# Altium PCB Board3ph.PcbDoc (part 2 of 2)
Units mm, origin at the board's own origin, x right, y up, seen from the top; angles counter-clockwise.
Board outline 64.06 x 79.42 mm, 4 copper layers (Top Layer, Mid Layer, Mid Layer 2, Bottom Layer), stack 0.743 mm thick; 89 components, 80 nets, 350 pads, 102 vias.
Unrouted connection lines stored in the file: 3.
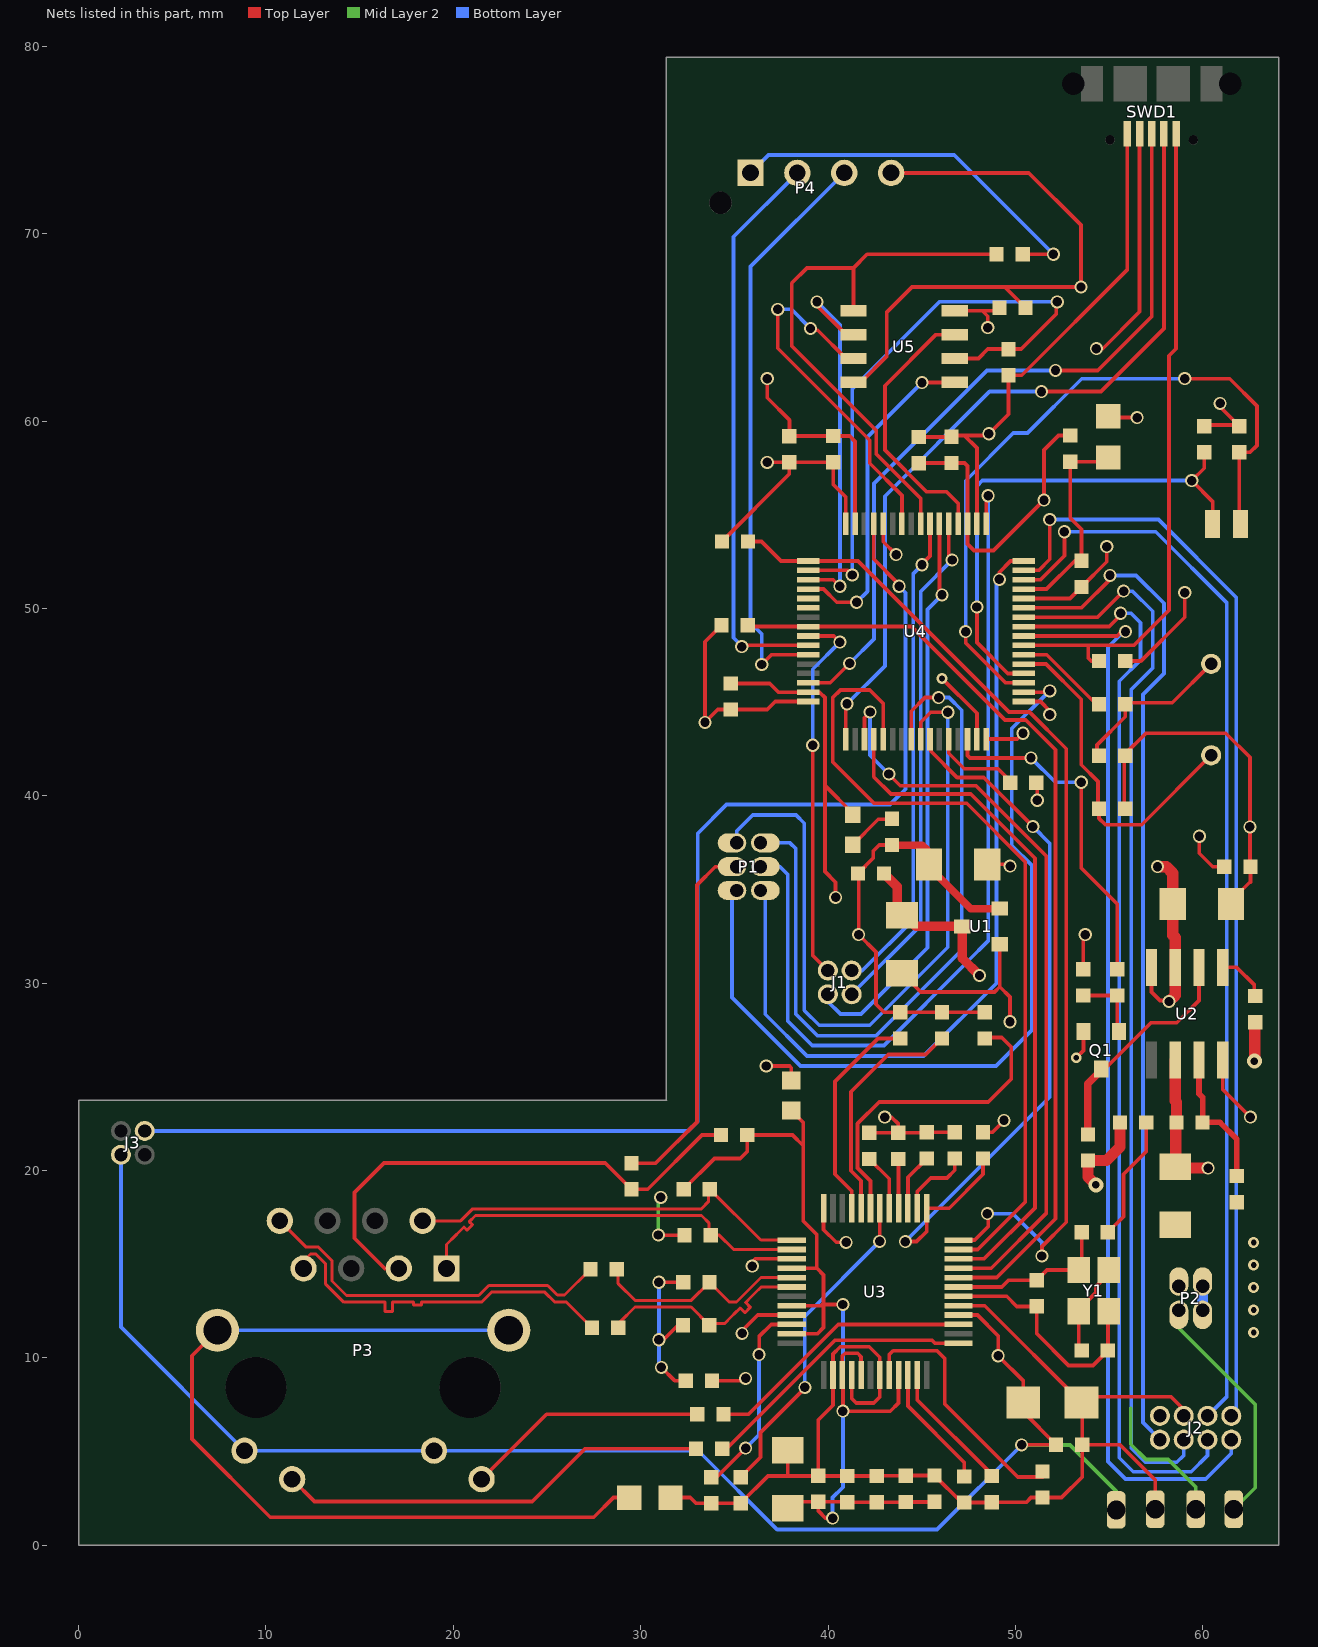
[diagram p4: the nets of this part, all layers, seen from the top]

## Part data (continued)
U5: "EEPROM Memory IC 2Mb _256K x 8_ SPI 5MHz 8-SO", Case Code (Metric)=SOIC-8, Manufacturer=STMicroelectronics, Manufacturer Part Number=M95M02-DWMN3TP/K, Supplier Part Number 1=497-15597-2-ND, ComponentLink1Description=Supplier, ComponentLink1URL=https://www.digikey.fr/product-detail/fr/stmicroelectronics/M95M04-DRMN6TP/497-M95M04-DRMN6TPDKR-ND/11482714, ComponentLink2Description=Datasheet, ComponentLink2URL=https://www.st.com/resource/en/datasheet/m95m04-dr.pdf, Memory Format=EEPROM, Memory Size=2Mb, Supplier 1=Digi-Key, Supplier Unit Price 1=$2.15
X1: library part XTAL, "8MHz ±30ppm Crystal 20pF 80 Ohms HC-49/US", Manufacturer="Fox Electronics", Manufacturer Part Number=FC4STCBMF8.0-BAG200, Supplier 1=Arrow, Supplier Part Number 1=FC4STCBMF8.0-BAG200, Supplier Unit Price 1=$0.2273
Y1: library part XTAL3225, "CRYSTAL 25.0000MHZ 8PF SMD", Case/Package=SMD/SMT, ESR (Equivalent Series Resistance)=100R, Frequency Stability=50ppm, Load Capacitance=8pF, Manufacturer="Kyocera AVX", Manufacturer Part Number=CX3225CA25000D0HSSCC, Supplier Part Number 1=1253-1142-1-ND, Tolerance=20ppm, ComponentLink1Description=Supplier, ComponentLink1URL=https://www.digikey.com/product-detail/en/kyocera-international-inc-electronic-components/CX3225CA25000D0HSSCC/1253-1142-1-ND/4453960, Frequency=25MHz, Supplier 1=Digi-Key
Y2: "ABS25 Series 32.768 kHz Â±20 ppm 6 pF -40 to +85 Â°C SMT Low Frequency Crystal", Case/Package=SMD/SMT, Frequency=32.768kHz, Frequency Tolerance=20ppm, Load Capacitance=9pF, Manufacturer="Micro Crystal", Manufacturer Part Number="CM8V-T1A 32.768kHz 9pF +/-20ppm TA QC", Max Operating Temperature=85°C, Min Operating Temperature=-40°C, Supplier Part Number 1=2195-CM8V-T1A-32.768KHZ-9PF-20PPM-TA-QCCT-ND, Length=2mm, Supplier 1=Digi-Key, Supplier Unit Price 1=$0.66

## Free pads (board coordinates)
  rrect50% 1x2 hole 1: 1(61.65,1.929) 2(59.618,1.929) 3(55.37,1.89) 3(57.459,1.929)

## Via types
v1: diameter 0.7, hole 0.5, Top Layer to Bottom Layer, 92 vias
v2: diameter 0.6, hole 0.3, Top Layer to Bottom Layer, 6 vias
v3: diameter 0.8, hole 0.4, Top Layer to Bottom Layer, 2 vias
v4: diameter 0.7, hole 0.5, Top Layer to Bottom Layer, tented both sides, 1 vias
v5: diameter 0.55, hole 0.3, Top Layer to Bottom Layer, 1 vias

## Nets (pads, with @x,y where several pads share a name; then routed paths per layer and width w, separated by ;. In a path a pad name is that pad's centre, name@x,y a point inside that pad or via, vN(x,y) a via of type N, cw(c..) or ccw(c..) an arc to the next point about the centre after c; other vN are vias at no path point)
+3V3: C2.2 C4.1 C6.2 C7.2 C8.2 C10.1 C11.2 C14.1 C25.1 C26.2 J3.1 L1.1 L2.1 P3.L1 P3.L3 P4.1 pad.3@55.37,1.89 R1.2 R3.1 R8.2 R14.2 R15.2 R16.2 R17.2 R21.2 R32.1 SWD1.4 U1.2 U3.28 U4.1 U4.19 U4.32 U4.48 U4.64 U5.8 | length 193.2
  Top Layer w0.2: R21.2@34.393,49.183 R21.2@34.31,49.1 33.43,48.22 v1(33.43,43.921) 34.109,44.6 C8.2@34.81,44.6 ; R17.2@34.54,53.57 R17.2@34.333,53.57 37.93,57.167 C7.2@37.93,57.793 ; C8.2@35.063,44.6 36.75,44.6 37.18,45.03 U4.48@38.94,45.03 ; v1(36.7,25.58) 37.94,25.58 38.03,25.49 L1.1@38.03,24.81 ; v1(36.75,57.793) C7.2@37.93,57.793 ; U4.32@40.94,54.53 40.94,55.95 40.28,56.61 C6.2@40.28,57.803 37.94,57.803 C7.2@37.93,57.793 ; R3.1@43.41,37.373 42.733,37.373 42.41,37.05 42.41,36.675 R1.2@41.591,35.856 41.63,35.817 v1(41.63,32.59) 42.56,31.66 42.56,28.875 42.988,28.447 R14.2@43.85,28.447 R15.2@46.08,28.447 R16.2@48.36,28.447 ; C11.2@44.84,57.753 46.58,57.753 C10.1@46.59,57.763 47.284,57.763 47.44,57.607 U4.19@47.44,54.53 47.44,53.433 47.783,53.09 48.83,53.09 v1(51.52,55.78) 51.52,58.46 52.29,59.23 L2.1@52.917,59.23 ; U5.8@46.753,65.88 48.229,65.88 ; U3.28@46.96,12.29 47.97,12.29 49.08,11.18 49.08,10.13 v1(49.07,10.12) 50.42,8.77 C25.1@50.42,7.63 50.42,7.11 C26.2@52.16,5.37 50.34,5.37 v1(50.33,5.36) ; R8.2@48.27,22.047 48.767,22.047 49.4,22.68 v1(49.39,22.68) ; U4.64@48.44,43.03 50.09,43.03 v1(50.4,43.34) ; v1(48.516,64.983) 48.516,65.593 48.229,65.88 ; C14.1@49.142,66.039 48.982,65.88 48.229,65.88 ; R32.1@50.387,68.9 v1(52.021,68.9) ; U4.1@50.44,45.03 51.331,45.03 51.83,44.531 v1(51.83,44.33) ; v1(54.313,63.862) 54.654,63.862 56.62,65.828 SWD1.4@56.62,75.325 ; v1(59.81,37.84) 59.81,36.934 60.526,36.218 C2.2@61.14,36.218
  Top Layer w0.4: R3.1@43.41,37.373 45.036,37.373 45.27,37.139 45.27,36.461 C4.1@45.39,36.341 45.39,36.191 47.6,33.98 U1.2@49.16,33.98 U1.2@49.135,34.005
  Mid Layer 2 w0.2: v1(50.33,5.36) 52.91,5.36 55.37,2.9 pad.3@55.37,1.89
  Bottom Layer w0.2: J3.1@2.262,20.844 2.262,11.648 P3.L1@8.86,5.05 P3.L3@18.97,5.05 33.07,5.05 37.28,0.84 45.81,0.84 v1(50.33,5.36) ; P4.1@35.86,73.24 36.814,74.194 46.727,74.194 v1(52.021,68.9)
+3V3A: C19.2 C20.2 C21.2 C22.2 C23.2 C37.1 L1.2 R18.2 R19.2 R20.2 U3.4 U3.8 U3.11 U3.15 U3.17 U3.21 | length 61
  Top Layer w0.2: v1(30.94,16.56) 30.95,16.55 R19.2@32.34,16.55 ; v1(31.067,18.57) v1@31.067,18.784 ; R18.2@32.293,19.01 33.933,20.65 35.31,20.65 35.68,21.02 R20.2@35.68,21.9 38.1,21.9 38.67,21.33 ; C37.1@37.85,1.98 38.193,2.323 C23.2@39.48,2.323 ; L1.2@38.03,23.21 38.67,22.57 38.67,21.33 ; U3.11@38.06,11.29 39.43,11.29 39.76,11.62 39.76,12.85 ; U3.8@38.06,12.79 39.64,12.79 39.7,12.85 ; U3.4@38.06,14.79 39.4,14.79 ; v1(40.24,1.45) 39.86,1.45 39.48,1.83 C23.2@39.48,2.323 ; v1(40.79,12.85) 39.76,12.85 ; U3.17@41.76,9.09 41.76,10.07 41.58,10.25 40.91,10.25 40.76,10.1 U3.15@40.76,9.09 40.79,9.06 v1(40.79,7.16) 43.32,7.16 43.76,7.6 U3.21@43.76,9.09 ; C19.2@45.68,2.333 45.66,2.313 C20.2@44.15,2.313 44.143,2.306 C21.2@42.59,2.306 C22.2@41.02,2.306 41.003,2.323 C23.2@39.48,2.323 ; 38.67,21.33 38.67,17.31 39.4,16.58 39.4,14.79 ; 39.4,14.79 39.76,14.43 39.76,12.91 39.7,12.85 ; 39.7,12.85 39.76,12.85
  Mid Layer 2 w0.2: v1(30.94,16.56) 30.94,18.443 v1(31.067,18.57)
  Bottom Layer w0.2: v1(40.24,1.45) 40.24,2.55 40.79,3.1 v1(40.79,7.16) v1(40.79,12.85)
ACTLED: R28.2 U3.27 | length 14.5
  Top Layer w0.2: R28.2@34.42,7 35.75,7 40.54,11.79 U3.27@46.96,11.79
BOOT0: R7.2 U4.60 | length 4.7
  Top Layer w0.2: U4.60@46.44,43.03 46.44,42.27 47.27,41.44 49.06,41.44 R7.2@49.77,40.73
CLK_L: J2.4 U4.9 | length 58
  Top Layer w0.2: U4.9@50.44,49.03 55,49.03 55.612,49.642 v1(55.612,49.74)
  Bottom Layer w0.2: v1(55.612,49.74) 56.16,49.74 56.67,49.23 56.67,47.24 55.54,46.11 55.54,4.67 56.28,3.93 59.38,3.93 60.248,4.798 J2.4@60.248,5.641
CS: J1.2 U4.41 | length 20.3
  Top Layer w0.2: U4.41@38.94,48.53 40.3,48.53 v1(40.63,48.2) ; v1(39.18,42.7) 39.18,31.483 J1.2@39.986,30.677
  Bottom Layer w0.2: v1(39.18,42.7) 39.18,46.75 v1(40.63,48.2)
CS_EE: R32.2 U4.24 U5.1 | length 29.5
  Top Layer w0.2: U5.1@41.353,65.88 41.353,68.17 ; U4.24@44.94,54.53 44.94,55.869 42.57,58.239 42.57,59.499 38.06,64.009 38.06,67.359 38.871,68.17 41.353,68.17 ; R32.2@48.99,68.9 42.083,68.9 41.353,68.17
CS_ETH: R21.1 U3.32 U4.40 | length 50.7
  Top Layer w0.2: R21.1@35.707,49.1 35.777,49.03 U4.40@38.94,49.03 44.453,49.03 49.443,44.04 50.549,44.04 52.135,42.453 52.135,17.425 49,14.29 U3.32@46.96,14.29
GND: C2.1 C3.2 C4.2 C5.2 C6.1 C7.1 C8.1 C9.1 C10.2 C11.1 C12.1 C13.1 C14.2 C16.1 C17.1 C18.1 C19.1 C20.1 C21.1 C22.1 C23.1 C24.1 C25.2 C26.1 C28.1 C29.1 C31.1 C32.1 C33.1 C34.1 C35.2 C36.2 C37.2 C38.2 J2.5 LED1.2 P1.4 P2.3 P2.4 P4.4 pad.3@57.459,1.929 Q1.2 R6.1 R7.1 R9.2 R10.2 R11.2 R12.2 R13.2 R23.1 R27.1 R33.2 R35.1 SWD1.5 U1.1 U2.8 U3.3 U3.9 U3.14 U3.16 U3.19 U3.29 U3.48 U4.12 U4.18 U4.28 U4.31 U4.47 U4.63 U5.4 Y1.2 Y1.4 | length 265.4
  Top Layer w0.2: C24.1@29.51,20.397 30.807,20.397 33,22.59 33,35.24 33.978,36.218 P1.4@35.125,36.218 ; C32.1@31.59,2.55 32.646,2.55 32.953,2.243 R23.1@33.76,2.243 R13.2@35.331,2.243 36.791,3.703 37.85,3.703 ; C31.1@33.807,8.79 35.48,8.79 v1(35.6,8.91) ; C8.1@34.81,45.997 36.883,45.997 37.35,45.53 U4.47@38.94,45.53 39.543,45.53 39.83,45.243 39.83,40.55 ; v1(35.41,11.31) 35.41,11.45 36.25,12.29 U3.9@38.06,12.29 ; v1(35.95,14.9) 35.95,15.12 36.12,15.29 U3.3@38.06,15.29 ; v1(36.75,62.26) 36.75,61.237 37.94,60.047 C7.1@37.94,59.2 ; C37.2@37.85,5.08 37.85,3.703 ; C7.1@37.93,59.19 C7.1@37.94,59.2 ; C23.1@39.48,3.72 39.48,6.699 40.26,7.479 U3.14@40.26,9.09 40.26,10.21 40.65,10.6 42.2,10.6 42.76,10.04 U3.19@42.76,9.09 42.76,7.92 42.44,7.6 41.5,7.6 41.26,7.84 U3.16@41.26,9.09 ; U3.48@39.76,17.99 39.76,16.84 40.43,16.17 v1(40.96,16.17) ; v1(40.4,34.58) 40.4,35.386 39.83,35.956 39.83,40.55 ; LED1.2@41.31,38.98 41.31,39.07 39.83,40.55 ; U5.4@41.353,62.07 41.753,62.07 43.123,63.44 43.123,65.793 44.48,67.15 49.428,67.15 ; U4.31@41.44,54.53 41.44,58.91 41.15,59.2 C6.1@40.28,59.2 C7.1@37.94,59.2 ; R12.2@42.2,22.02 43.747,22.02 R11.2@43.75,22.017 ; U4.28@42.94,54.53 42.94,53.56 v1(43.63,52.87) ; v1(43.02,22.85) 43.39,22.85 43.75,22.49 R11.2@43.75,22.017 ; P4.4@43.36,73.24 50.71,73.24 53.495,70.455 v1(53.495,67.15) 49.428,67.15 ; C3.2@43.94,30.53 44.939,29.531 48.877,29.531 49.16,29.814 ; C11.1@44.84,59.15 46.58,59.15 C10.2@46.59,59.16 46.66,59.23 47.27,59.23 ; v2(46.08,46.26) 47.94,44.4 U4.63@47.94,43.03 ; R9.2@46.76,22.047 R10.2@45.27,22.047 45.24,22.017 R11.2@43.75,22.017 ; U3.29@46.96,12.79 48.36,12.79 C25.2@53.52,7.63 ; U4.18@47.94,54.53 47.94,58.56 47.27,59.23 ; C4.2@48.49,36.341 49.617,36.341 v1(49.713,36.245) ; U1.1@49.16,32.08 49.16,29.814 ; v1(49.71,27.94) 49.71,29.264 49.16,29.814 ; U4.12@50.44,50.53 52.91,50.53 C9.1@53.52,51.14 54.87,52.49 v1(54.87,53.3) ; C14.2@50.539,66.039 49.428,67.15 ; v1(51.16,39.76) 51.16,39.82 51.167,39.827 R7.1@51.167,40.73 ; v5(53.24,26.02) 53.627,26.407 Q1.2@53.627,27.423 ; C29.1@53.533,10.4 53.37,10.563 Y1.2@53.37,12.49 53.37,12.56 54.3,13.49 54.3,13.82 54.97,14.49 Y1.4@54.97,14.69 Y1.4@54.927,14.733 ; R35.1@53.617,30.74 53.617,32.487 v1(53.72,32.59) ; C5.2@54.533,60.46 54.638,60.565 C5.2@54.953,60.25 55.02,60.183 v1(56.493,60.183) ; C28.1@54.927,16.71 55.758,17.541 55.758,19.8 56.977,21.019 C38.2@56.977,22.57 ; C16.1@55.797,39.31 55.797,42.18 56.957,43.34 61.224,43.34 62.51,42.054 v1(62.51,38.34) 62.51,36.245 C2.1@62.537,36.218 62.537,35.386 62.506,35.386 61.494,34.374 C12.1@61.494,34.224 ; C17.1@55.857,47.19 56.69,47.19 59.03,49.53 v1(59.03,50.84) ; SWD1.5@55.97,75.325 55.97,68.08 50.33,62.44 R33.2@49.623,62.44 49.623,60.363 48.49,59.23 47.27,59.23 ; pad.3@57.459,1.929 57.459,3.491 55.58,5.37 C26.1@53.557,5.37 ; J2.5@58.978,6.911 58.978,7.252 58.3,7.93 53.52,7.93 C25.2@53.52,7.63 ; C35.2@60.069,59.727 60.127,59.785 C36.2@61.865,59.785 ; v1(60.919,60.944) 61.014,60.849 61.014,60.658 C36.2@61.945,59.727 ; U2.8@61.065,25.895 61.065,24.322 v1(62.537,22.85) ; 37.85,3.703 C22.1@41.02,3.703 C21.1@42.59,3.703 42.597,3.71 C20.1@44.15,3.71 44.17,3.73 C19.1@45.68,3.73 47.127,2.283 C34.1@47.27,2.283 48.72,2.283 R27.1@48.74,2.303 50.587,2.303 50.834,2.55 C33.1@51.44,2.55 52.457,2.55 53.557,3.65 C26.1@53.557,5.37 ; C25.2@53.52,7.63 53.557,7.593 C26.1@53.557,5.37
  Bottom Layer w0.6: P2.3@59.98,12.57 P2.4@59.98,13.84
  other v1: 48.58,59.32
  other v2: 62.706,11.362 62.706,12.562 62.706,13.762 62.706,14.962 62.706,16.162
GNDA: C32.2 P3.1 P3.2 | length 47.4
  Top Layer w0.2: P3.2@7.41,11.48 6.05,10.12 6.05,5.68 10.23,1.5 27.49,1.5 28.54,2.55 C32.2@29.39,2.55
  Bottom Layer w0.2: P3.2@7.41,11.48 P3.1@22.96,11.48
HOLD_EE: U4.20 U5.7 | length 14.4
  Top Layer w0.2: U5.7@46.753,64.61 45.753,64.61 43.03,61.887 43.03,58.448 45.251,56.226 46.314,56.226 46.94,55.6 U4.20@46.94,54.53
IRQ: J2.8 U4.11 | length 54.4
  Top Layer w0.2: U4.11@50.44,50.03 53.526,50.03 55.045,51.549 v1(55.045,51.76)
  Bottom Layer w0.2: v1(55.045,51.76) 56.43,51.76 57.92,50.27 57.92,46.52 56.8,45.4 56.8,6.549 J2.8@57.708,5.641
LD_PWR_G: U4.38
LD_PWR_R: U4.37
LED1: P1.5 U4.56 | length 39.6
  Top Layer w0.2: U4.56@44.44,43.03 44.44,44.51 45.169,45.239 v1(45.9,45.239)
  Bottom Layer w0.2: P1.5@36.395,37.488 37.972,37.488 38.27,37.19 38.27,28.35 39.43,27.19 42.55,27.19 43.877,28.517 47.13,31.77 47.13,44.569 46.459,45.239 v1(45.9,45.239)
LED2: P1.6 U4.57 | length 39.6
  Top Layer w0.2: U4.57@44.94,43.03 44.94,43.921 45.478,44.46 v1(46.39,44.46)
  Bottom Layer w0.2: P1.6@35.125,37.488 35.125,38.125 35.98,38.98 38.29,38.98 38.73,38.54 38.73,28.55 39.53,27.75 42.22,27.75 46.39,31.92 v1(46.39,44.46)
LINKLED: R26.2 U3.25 | length 15.1
  Top Layer w0.2: R26.2@34.35,5.16 34.576,5.16 40.366,10.95 45.55,10.95 45.71,10.79 U3.25@46.96,10.79
MISO: J1.1 U4.22 | length 30.5
  Top Layer w0.2: U4.22@45.94,54.53 45.94,50.86 v1(46.08,50.72)
  Bottom Layer w0.2: J1.1@39.986,29.407 39.986,29.02 40.656,28.35 41.76,28.35 45.3,31.89 45.3,49.94 v1(46.08,50.72)
MISO_EE: U4.35 U5.2 | length 20.3
  Top Layer w0.2: U4.35@38.94,51.53 40.28,51.53 v1(40.63,51.18) ; v1(39.41,66.36) 39.41,66.153 40.953,64.61 U5.2@41.353,64.61
  Bottom Layer w0.2: v1(39.41,66.36) 40.63,65.14 v1(40.63,51.18)
MISO_ETH: U3.34 U4.52 | length 36.3
  Top Layer w0.2: U4.52@42.44,43.03 42.44,41.01 43.36,40.09 47.61,40.09 51.035,36.665 51.035,18.005 48.32,15.29 U3.34@46.96,15.29
MOSI: J1.4 U4.23 | length 25.9
  Top Layer w0.2: v1(45.01,52.33) 45.01,52.37 45.44,52.8 U4.23@45.44,54.53
  Bottom Layer w0.2: J1.4@41.256,30.677 41.827,30.677 44.55,33.4 44.55,51.87 v1(45.01,52.33)
MOSI_EE: U4.36 U5.5 | length 17.8
  Top Layer w0.2: U4.36@38.94,51.03 39.761,51.03 40.462,50.33 v1(41.52,50.33) ; v1(45.01,62.05) 46.733,62.05 U5.5@46.753,62.07
  Bottom Layer w0.2: v1(41.52,50.33) 42.1,50.91 42.1,59.14 v1(45.01,62.05)
MOSI_ETH: U3.35 U4.53 | length 43.7
  Top Layer w0.2: U4.53@42.94,43.03 42.94,44.93 42.22,45.65 40.66,45.65 40.25,45.24 40.25,41.8 42.45,39.6 47.4,39.6 50.515,36.485 50.515,18.315 47.99,15.79 U3.35@46.96,15.79
NetC5_1: C5.1 C9.2 L2.2 U4.13 | length 11.4
  Top Layer w0.2: U4.13@50.44,51.03 51.651,51.03 53.158,52.537 C9.2@53.52,52.537 53.52,54.229 52.917,54.832 L2.2@52.917,57.833 54.736,57.833 C5.1@54.953,58.05 C5.1@54.98,58.023
NetC18_2: C18.2 R29.2 X1.1 | length 8.9
  Top Layer w0.2: C18.2@54.35,42.13 54.35,42.71 55.857,44.217 R29.2@55.857,44.89 ; R29.2@55.783,44.963 58.364,44.963 X1.1@60.44,47.04
NetC24_2: C24.2 P3.R3 R20.1 | length 27.5
  Top Layer w0.2: P3.R3@17.09,14.78 16.34,14.78 14.73,16.39 14.73,18.83 16.3,20.4 28.11,20.4 C24.2@29.51,19 30.372,19 33.272,21.9 R20.1@34.283,21.9
NetC31_2: C31.2 R24.1 R25.1 | length 9.1
  Top Layer w0.2: v1(30.97,10.97) 31.21,10.97 31.99,11.75 R24.1@32.26,11.75 ; v1(30.97,14.04) R25.1@32.27,14.04 R25.1@32.26,14.03 ; v1@31.11,9.51 v1(31.1,9.5) 31.81,8.79 C31.2@32.41,8.79
  Mid Layer 2 w0.2: v1@31.09,9.51 v1(31.1,9.5)
  Bottom Layer w0.2: v1(30.97,14.04) v1(30.97,10.97) 30.97,9.63 v1@31.09,9.51
NetC33_2: C33.2 U3.20 | length 13.6
  Top Layer w0.2: U3.20@43.26,9.09 43.26,10.18 43.47,10.39 45.81,10.39 46.23,9.97 46.23,7.54 50.12,3.65 C33.2@51.44,3.65
NetC34_2: C34.2 U3.22 | length 6.7
  Top Layer w0.2: U3.22@44.26,9.09 44.26,7.43 47.27,4.42 C34.2@47.27,3.68
NetC35_1: C35.1 U4.4 Y2.1 | length 27.7
  Top Layer w0.2: v1(47.94,50.077) 47.94,48.18 49.59,46.53 U4.4@50.44,46.53 ; C35.1@60.069,58.33 60.069,57.482 v1(59.407,56.82) 60.52,55.707 Y2.1@60.52,54.51
  Bottom Layer w0.2: v1(47.94,50.077) 47.94,56.531 48.229,56.82 v1(59.407,56.82)
NetC36_1: C36.1 U4.3 Y2.2 | length 38.1
  Top Layer w0.2: v1(47.34,48.76) 47.34,48.16 49.47,46.03 U4.3@50.44,46.03 ; v1(59.03,62.26) 61.43,62.26 62.89,60.8 62.89,58.7 62.52,58.33 C36.1@61.945,58.33 61.945,54.585 Y2.2@62.02,54.51
  Bottom Layer w0.2: v1(47.34,48.76) 47.34,56.81 49.885,59.355 50.635,59.355 53.54,62.26 v1(59.03,62.26)
NetLED1_1: LED1.1 R3.2 | length 2.7
  Top Layer w0.2: LED1.1@41.31,37.38 42.68,38.75 43.39,38.75 R3.2@43.41,38.77
NetP3_L2: P3.L2 R26.1 | length 23.2
  Top Layer w0.2: P3.L2@11.4,3.53 12.59,2.34 24.21,2.34 27.03,5.16 R26.1@32.953,5.16
NetP3_L4: P3.L4 R28.1 | length 13
  Top Layer w0.2: P3.L4@21.51,3.53 24.98,7 R28.1@33.023,7
NetQ1_1: Q1.1 R34.2 R35.2 | length 3.8
  Top Layer w0.2: R35.2@53.617,29.343 R34.2@55.429,29.343 55.429,27.522 Q1.1@55.527,27.423
NetQ1_3: Q1.3 R2.1 U2.2 | length 12.3
  Top Layer w0.2: Q1.3@54.577,25.423 54.577,25.492 54.828,25.492 57.23,27.894 58.61,27.894 59.795,29.078 U2.2@59.795,30.845
  Top Layer w0.4: R2.1@53.867,21.93 53.867,24.644 54.577,25.354 Q1.3@54.577,25.423
NetR4_2: R4.2 U2.1 | length 2.8
  Top Layer w0.2: U2.1@60.965,30.845 U2.1@61.065,30.845 61.812,30.845 62.747,29.91 62.747,29.37 R4.2@62.8,29.317
NetR5_1: R5.1 R6.2 U2.7 | length 7.6
  Top Layer w0.3: U2.7@59.795,25.895 59.795,24.1 59.985,23.91 R5.1@59.985,22.57 60.915,22.57 61.812,21.673 R6.2@61.812,19.712
NetR9_1: R9.1 U3.38 | length 4
  Top Layer w0.2: U3.38@44.76,17.99 44.76,18.89 45.48,19.61 46.35,19.61 46.76,20.02 R9.1@46.76,20.65
NetR10_1: R10.1 U3.39 | length 3.1
  Top Layer w0.2: U3.39@44.26,17.99 44.26,19.64 R10.1@45.27,20.65
NetR11_1: R11.1 U3.40 | length 2.6
  Top Layer w0.2: R11.1@43.75,20.62 43.76,20.61 U3.40@43.76,17.99
NetR12_1: R12.1 U3.41 | length 3.1
  Top Layer w0.2: R12.1@42.2,20.623 43.26,19.563 U3.41@43.26,17.99
NetR13_1: R13.1 U3.42 | length 17.4
  Top Layer w0.2: R13.1@35.331,3.64 36.398,4.707 36.398,6.029 38.76,8.391 v1(38.76,8.43) ; v1(42.75,16.22) 42.75,17.98 U3.42@42.76,17.99
  Bottom Layer w0.2: v1(38.76,8.43) 38.76,12.23 v1(42.75,16.22)
NetR23_2: R23.2 U3.10 | length 10.7
  Top Layer w0.2: R23.2@33.76,3.64 34.05,3.64 v1(35.6,5.19) ; v1(36.31,10.18) 36.32,10.19 36.32,11.14 36.97,11.79 U3.10@38.06,11.79
  Bottom Layer w0.2: v1(35.6,5.19) 36.31,5.9 v1(36.31,10.18)
NetR27_2: R27.2 U3.23 | length 7
  Top Layer w0.2: U3.23@44.76,9.09 44.76,7.76 48.74,3.78 R27.2@48.74,3.7
NetR34_1: R34.1 U4.62 | length 18.3
  Top Layer w0.2: U4.62@47.44,43.03 47.44,42.154 47.573,42.021 v1(50.83,42.021) ; v1(53.51,40.72) 53.51,36.142 55.429,34.224 R34.1@55.429,30.74
  Bottom Layer w0.2: v1(50.83,42.021) 52.131,40.72 v1(53.51,40.72)
NetSWD1_2: SWD1.2 U4.49 | length 42.6
  Top Layer w0.2: U4.49@40.94,43.03 v1@40.94,44.72 ; v1(51.39,61.57) 54.56,61.57 57.92,64.93 SWD1.2@57.92,75.325
  Bottom Layer w0.2: v1(41.01,44.91) 43.03,46.93 43.03,55.98 48.62,61.57 v1(51.39,61.57)
NetSWD1_3: SWD1.3 U4.46 | length 41
  Top Layer w0.2: U4.46@38.94,46.03 40.11,46.03 v1(41.15,47.07) ; v1(52.131,62.7) 54.39,62.7 57.27,65.58 SWD1.3@57.27,75.325
  Bottom Layer w0.2: v1(41.15,47.07) 42.45,48.37 42.45,56.67 48.48,62.7 v1(52.131,62.7)
OE: J2.6 U4.10 | length 57.3
  Top Layer w0.2: U4.10@50.44,49.53 54.38,49.53 v1(55.77,50.92) v1@55.77,50.77
  Bottom Layer w0.2: v1(55.77,50.92) 56.25,50.92 57.32,49.85 57.32,46.82 56.18,45.68 56.18,5.19 56.94,4.43 58.61,4.43 58.978,4.798 J2.6@58.978,5.641
PH0-OSC_IN: C16.2 U4.5 X1.2 | length 18.3
  Top Layer w0.2: U4.5@50.44,47.03 51.63,47.03 53.51,45.15 53.51,41.66 54.4,40.77 54.4,39.31 C16.2@54.46,39.31 54.46,38.796 54.802,38.454 56.734,38.454 X1.2@60.44,42.16
PH1-OSC_OUT: R29.1 U4.6 | length 5
  Top Layer w0.2: U4.6@50.44,47.53 51.673,47.53 R29.1@54.313,44.89
PIO0_7/INT_N: R17.1 U3.36 U4.33 | length 56
  Top Layer w0.2: R17.1@35.73,53.57 36.45,53.57 37.49,52.53 U4.33@38.94,52.53 41.591,52.53 49.651,44.47 50.75,44.47 52.705,42.515 52.705,17.245 51.41,15.95 v1(51.41,15.44) ; U3.36@46.96,16.29 47.83,16.29 48.55,17.01 48.55,17.65 v1(48.5,17.7)
  Bottom Layer w0.2: v1(48.5,17.7) 49.87,17.7 51.41,16.16 v1(51.41,15.44)
PM0: J2.3 U4.14 | length 58
  Top Layer w0.2: U4.14@50.44,51.53 51.331,51.53 52.61,52.809 v1(52.61,54.09)
  Bottom Layer w0.2: v1(52.61,54.09) 57.48,54.09 61.28,50.29 61.28,7.943 J2.3@60.248,6.911
PM1: J2.1 U4.15 | length 59.2
  Top Layer w0.2: U4.15@50.44,52.03 51.24,52.03 51.83,52.62 v1(51.83,54.74)
  Bottom Layer w0.2: v1(51.83,54.74) 57.625,54.74 61.78,50.585 61.78,49.815 61.78,7.173 J2.1@61.518,6.911
PMODE0: R14.1 U3.45 | length 11.6
  Top Layer w0.2: U3.45@41.26,17.99 41.26,18.91 40.37,19.8 40.37,24.75 42.67,27.05 R14.1@43.85,27.05
PMODE1: R15.1 U3.44 | length 12.5
  Top Layer w0.2: U3.44@41.76,17.99 41.76,19.453 41.219,19.993 41.219,24.209 43.21,26.2 45.215,26.2 46.08,27.065 R15.1@46.08,27.1
POMDE2: R16.1 U3.43 | length 17.4
  Top Layer w0.2: U3.43@42.26,17.99 42.26,19.447 41.569,20.138 41.569,22.505 42.724,23.66 48.55,23.66 49.77,24.88 49.77,26.6 49.27,27.1 48.41,27.1 R16.1@48.367,27.057 ; R16.1@48.36,27.05 R16.1@48.367,27.057 ; R16.1@48.36,27.1 48.36,27.065 R16.1@48.367,27.057
RESET: J3.4 U4.29 | length 72
  Top Layer w0.2: U4.29@42.44,54.53 42.44,52.63 43.79,51.28 v1(43.79,51.18)
  Bottom Layer w0.2: J3.4@3.532,22.114 3.536,22.11 32.53,22.11 33.04,22.62 33.04,37.995 34.575,39.53 43.31,39.53 44.13,40.35 44.13,50.84 v1(43.79,51.18)
RI: P1.2 U4.2 | length 45
  Top Layer w0.2: U4.2@50.44,45.53 51.76,45.53 v1(51.83,45.6)
  Bottom Layer w0.2: P1.2@35.125,34.948 34.871,34.694 34.871,29.239 38.53,25.58 48.96,25.58 50.88,27.5 50.88,36.283 49.8,37.363 49.8,43.589 51.811,45.6 v1(51.83,45.6)
RLY1: J2.2 U4.8 | length 58.6
  Top Layer w0.2: U4.8@50.44,48.53 55.43,48.53 55.66,48.76 v1(55.87,48.76)
  Mid Layer 2 w0.2: v1@55.77,48.76 v1(55.87,48.76)
  Bottom Layer w0.2: v1(55.87,48.76) 55.77,48.76 54.94,47.93 54.94,4.47 55.87,3.54 60.15,3.54 61.518,4.908 J2.2@61.518,5.641
RST: C17.2 SWD1.1 U4.7 | length 35.4
  Top Layer w0.2: U4.7@50.44,48.03 53.88,48.03 ; C17.2@54.46,47.19 54.04,47.19 53.88,47.35 53.88,48.03 ; SWD1.1@58.57,75.325 58.57,63.862 58.195,63.487 58.195,49.905 56.32,48.03 53.88,48.03
RX2_N: C30.1 P3.R8 | length 19.9
  Top Layer w0.16: P3.R8@10.74,17.32 12.15,15.91 12.809,15.91 13.53,15.189 13.53,14.11 14.305,13.335 21.355,13.335 21.891,13.87 25.035,13.87 25.55,13.355 25.938,13.355 C30.1@27.323,14.74
RX2_P: C27.1 P3.R7 | length 19.9
  Top Layer w0.16: P3.R7@12.01,14.78 12.01,15.18 12.38,15.55 12.66,15.55 13.17,15.04 13.17,13.961 14.051,13.08 14.156,12.975 14.57,12.975 15.74,12.975 15.945,12.975 16.355,12.975 16.355,12.475 16.765,12.475 16.765,12.975 17.175,12.975 17.27,12.975 17.475,12.975 17.885,12.975 17.885,12.835 18.295,12.835 18.295,12.975 18.68,12.975 21.505,12.975 21.61,13.08 22.04,13.51 24.886,13.51 25.401,12.995 26.018,12.995 C27.1@27.403,11.61
RX_DEBG: P4.3 U4.43 | length 31.2
  Top Layer w0.2: v1(36.46,47.01) 36.98,47.53 U4.43@38.94,47.53
  Bottom Layer w0.2: v1(36.46,47.01) 36.46,48.63 35.86,49.23 35.86,68.24 P4.3@40.86,73.24
RX_N: C30.2 R25.2 U3.5 | length 11.8
  Top Layer w0.16: C30.2@28.72,14.74 28.8,14.66 28.8,13.965 29.69,13.075 32.702,13.075 R25.2@33.667,14.04 34.722,12.985 35.115,12.985 36.421,14.29 U3.5@38.06,14.29
RX_P: C27.2 R24.2 U3.6 | length 11.8
  Top Layer w0.16: C27.2@28.8,11.61 28.88,11.69 28.88,11.905 29.69,12.715 32.692,12.715 R24.2@33.657,11.75 33.737,11.83 34.47,11.83 34.875,12.235 35.02,12.38 35.31,12.67 35.56,12.42 35.85,12.71 35.6,12.96 35.89,13.25 36.05,13.41 36.43,13.79 U3.6@38.06,13.79
RX_UC: P1.3 U4.17 | length 48.3
  Top Layer w0.2: U4.17@48.44,54.53 48.44,55.91 v1(48.54,56.01)
  Bottom Layer w0.2: P1.3@36.395,36.218 37.432,36.218 37.85,35.8 37.85,27.98 39.15,26.68 42.98,26.68 47.48,31.18 47.48,31.197 48.54,32.257 v1(48.54,56.01)
SCLK: J1.3 U4.21 | length 27.4
  Top Layer w0.2: U4.21@46.44,54.53 46.44,52.762 v1(46.616,52.586)
  Bottom Layer w0.2: J1.3@41.256,29.407 44.95,33.101 44.95,50.92 v1(46.616,52.586)
SCLK_EE: R33.1 U4.34 U5.6 | length 32.3
  Top Layer w0.2: U4.34@38.94,52.03 41.04,52.03 v1(41.29,51.78) ; U5.6@46.753,63.34 48.019,63.34 48.516,63.837 R33.1@49.623,63.837 50.304,63.837 52.177,65.71 52.177,66.307 v1(52.23,66.36)
  Bottom Layer w0.2: v1(41.29,51.78) 41.29,61.71 45.94,66.36 v1(52.23,66.36)
SCLK_ETH: U3.33 U4.51 | length 40.5
  Top Layer w0.2: U4.51@41.94,43.03 41.94,44.17 v1(42.24,44.47) ; v1(43.24,41.16) 43.24,41.15 43.85,40.54 47.896,40.54 51.635,36.801 51.635,17.715 48.71,14.79 U3.33@46.96,14.79
  Bottom Layer w0.2: v1(42.24,44.47) 42.24,42.16 v1(43.24,41.16)
TX_DEBG: P4.2 U4.42 | length 30.5
  Top Layer w0.2: v1(35.39,47.96) 35.46,48.03 U4.42@38.94,48.03
  Bottom Layer w0.2: v1(35.39,47.96) 35.39,47.999 34.95,48.439 34.95,69.83 P4.2@38.36,73.24
TX_N: P3.R2 R18.1 U3.1 | length 21.9
  Top Layer w0.16: P3.R2@18.36,17.32 20.391,17.32 21.031,17.96 33.24,17.96 33.61,18.33 33.61,18.93 R18.1@33.69,19.01 36.41,16.29 U3.1@38.06,16.29
TX_P: P3.R1 R19.1 U3.2 | length 21.9
  Top Layer w0.16: P3.R1@19.63,14.78 19.63,16.05 20.13,16.55 20.275,16.695 20.565,16.985 20.728,16.821 21.018,17.111 20.855,17.275 21.18,17.6 33.24,17.6 33.657,17.183 33.657,16.63 R19.1@33.737,16.55 34.198,16.55 34.958,15.79 U3.2@38.06,15.79
TX_UC: P1.1 U4.16 | length 45.1
  Top Layer w0.2: v1(49.14,51.55) 49.14,51.93 49.74,52.53 U4.16@50.44,52.53
  Bottom Layer w0.2: P1.1@36.395,34.948 36.649,34.694 36.649,28.341 38.88,26.11 45.099,26.11 48.99,30.001 48.99,51.4 v1(49.14,51.55)
VBAT: C13.2 P2.1 P2.2 pad.1 R4.1 R5.2 U2.6 | length 21.5
  Top Layer w0.6: U2.6@58.525,25.895 58.525,23.723 58.588,23.66 R5.2@58.588,22.57 58.557,22.538 58.557,20.241 C13.2@58.525,20.21 58.596,20.138 60.272,20.138 v1(60.28,20.13) ; v3(62.747,25.84) 62.774,25.866 62.774,27.894 R4.1@62.8,27.92
  Mid Layer 2 w0.2: P2.1@58.71,11.6 62.79,7.52 62.79,3.069 pad.1@61.65,1.929
VCC=5V: C3.1 C12.2 C38.1 J2.7 pad.2 R1.1 R2.2 U1.3 U2.3 U2.4 | length 31.9
  Top Layer w0.2: U2.4@57.255,30.845 57.255,29.531 57.708,29.078 58.137,29.078 v4(58.195,29.02)
  Top Layer w0.5: R1.1@42.988,35.856 43.682,35.162 43.682,33.887 C3.1@43.94,33.63 44.09,33.63 44.69,33.03 U1.3@47.16,33.03 47.16,31.33 v1(48.08,30.41)
  Top Layer w0.6: v3(54.29,19.24) 53.867,19.663 R2.2@53.867,20.533 54.847,20.533 55.58,21.266 C38.1@55.58,22.57 ; v1(57.577,36.218) 58.043,36.218 58.394,35.867 C12.2@58.394,34.224 58.394,32.564 58.525,32.433 U2.3@58.525,30.845 58.525,29.35 v4(58.195,29.02)
  Mid Layer 2 w0.2: 56.15,7.32 56.15,5.4 56.97,4.58 58.15,4.58 59.618,3.112 pad.2@59.618,1.929
W5500_RST: R8.1 U3.37 U4.58 | length 40.7
  Top Layer w0.2: v1(44.12,16.21) 44.72,16.21 45.26,16.75 U3.37@45.26,17.99 46.46,17.99 48.27,19.8 R8.1@48.27,20.65 ; U4.58@45.44,43.03 45.49,42.98 45.49,42.376 46.886,40.98 48.305,40.98 v1(50.927,38.357)
  Bottom Layer w0.2: v1(44.12,16.21) 51.83,23.92 51.83,37.455 v1(50.927,38.357)
W_EE: U4.26 U5.3 | length 19.3
  Top Layer w0.2: v1(37.31,65.96) 37.31,63.88 42.22,58.97 42.22,57.748 43.94,56.028 U4.26@43.94,54.53 ; v1(39.06,64.94) 39.156,64.844 39.449,64.844 40.953,63.34 U5.3@41.353,63.34
  Bottom Layer w0.2: v1(37.31,65.96) 38.04,65.96 v1(39.06,64.94)
XI: C29.2 R22.2 U3.30 Y1.3 | length 12.8
  Top Layer w0.2: U3.30@46.96,13.29 49.53,13.29 50.067,12.753 R22.2@51.14,12.753 51.14,11.29 52.83,9.6 54.13,9.6 C29.2@54.93,10.4 54.93,12.45 Y1.3@54.97,12.49
XO: C28.2 R22.1 U3.31 Y1.1 | length 8.9
  Top Layer w0.2: U3.31@46.96,13.79 49.27,13.79 49.63,14.15 R22.1@51.14,14.15 51.68,14.69 Y1.1@53.37,14.69 53.53,14.85 C28.2@53.53,16.71
pads on no net: J3.2 J3.3 P3. P3.R4 P3.R5 P3.R6 P4.5 SWD1.6 SWD1.7 SWD1.8 SWD1.9 SWD1.None U2.5 U3.7 U3.12 U3.13 U3.18 U3.24 U3.26 U3.46 U3.47 U4.25 U4.27 U4.30 U4.39 U4.44 U4.45 U4.50 U4.54 U4.55 U4.59 U4.61

## Polygon pours and split planes (outlines as drawn)
GND on Mid Layer "Mid Layer-GND" (solid, pour order 6): 31.867,68.91 63,68.91 63,0.8 31.649,0.8
no net on Mid Layer "Mid Layer-No Net" (solid, pour order 8): 5.64,23.03 5.64,13.32 29.58,13.32 29.58,0.93 5.64,0.93 5.64,22.63
VBAT on Mid Layer 2 "VBAT_L03_P021" (solid, pour order 21): 57.708,27.82 63.38,27.82 63.38,19.56 59.607,19.56 59.618,19.275 59.618,18.979 59.618,11.6 57.889,11.6 57.708,11.781
+3V3 on Mid Layer 2 "Mid Layer 2-+3.3V" (solid, pour order 14): 32.535,68.8 63.077,68.8 63.077,33.04 46.27,33.04 46.27,25.86 52.68,25.86 52.68,4.66 47.46,4.66 47.46,8.65 39.649,17.901 39.649,24.44 32.28,24.44
+3V3A on Mid Layer 2 "Mid Layer 2-+3V3A" (solid, pour order 10): 30.65,22.34 38.82,22.34 38.82,17.398 46.345,8.405 46.21,0.88 30.65,0.88 30.65,14.8
+3V3A on Mid Layer 2 "Mid Layer 2-+3V3A 1" (solid, pour order 16): 32.28,23.674 32.356,23.674 38.82,23.674 38.82,22.111 32.28,22.111
GND on Top Layer "GND_L01_P020" (solid, pour order 20): 54.35,18.66 63.42,18.66 63.42,10.4 59.456,10.4 59.456,15.282 59.298,15.44 56.858,15.44 56.858,13.812 54.3,13.82

## Other copper
Mid Layer 2:
  region net VCC=5V: 54.89,7.46 58.07,7.46 58.07,6.5 58.03,6.46 54.89,6.46
  region net VCC=5V: 47.698,32.08 59.336,32.08 59.335,28.44 47.698,28.44
  region net VCC=5V: 56.82,28.44 56.82,6.47 53.67,6.47 53.67,28.44

## Silkscreen, mask and mechanical layers (free items; w line width, h text height)
Top Overlay:
  circle w0.2: c52.44,15.84 r0.1
  circle w0.2: c63.177,21.31 r0.1
  circle w0.2: c57.567,21.31 r0.1
  lines w0.025: 63.311,58.028 63.311,60.136
  lines w0.254: 54.485,0.786 54.485,3.072 54.742,3.329 63.124,3.329 63.324,3.129 63.324,0.829 63.124,0.629 54.642,0.629 54.485,0.786
  text "+3.3V" at 32.42,68.96 h1
  text "TX" at 37.75,68.96 h1
  text "RX" at 40.07,68.96 h1
  text "GND" at 42.33,68.96 h1
  text "+" at 44.453,34.948 h0.7
  text "+" at 42.45,32.59 h0.7
  text "+5V" at 60.83,1.37 h0.5 r90
  text "GND" at 58.79,1.34 h0.5 r90
  text "VBAT" at 62.994,1.04 h0.5 r90
  text "+3.3V" at 56.71,0.82 h0.5 r90
Mechanical 1:
  lines w0.254: 0,23.74 0,0 64.06,0 64.06,79.42 31.37,79.42 31.37,23.76 0.03,23.76
Mechanical 4:
  circle w0.2: c52.577,29.56 r0.1
  circle w0.2: c52.577,29.56 r0.1
  circle w0.2: c63.01,55.59 r0.1
  circle w0.2: c63.01,55.59 r0.1
  circle w0.2: c60.737,21.08 r0.1
  circle w0.2: c60.737,21.08 r0.1
  circle w0.2: c53.07,29.58 r0.1
Board Outline:
  lines w0.254: 0,23.74 0,0.02 0.02,0 64.06,0 64.06,79.42 31.37,79.42 31.37,23.771 ; 0.02,23.76 31.38,23.76
Mechanical 10:
  lines w0.254: -0.01,23.73 -0.01,0.01 0.01,-0.01 64.05,-0.01 64.05,79.41 31.36,79.41 31.36,23.761 ; 0.01,23.75 31.37,23.75

## Dimensions
0.01,-0.01 to 64.05,-0.01 on Mechanical 10
0.01,-0.01 to 0.01,23.75 on Mechanical 10

## Text inside footprints (layer, text, board x,y; h text height)
J2: Mechanical 1 "J1" at 58.913,9.527 h0.76 r180
J3: Mechanical 1 "J1" at 3.597,18.228 h0.76
P2: Mechanical 1 "J1" at 57.699,9.634 h1